# Altium PCB PCI Express_16765X6890_64PIN_Low profile.PCBDOC (part 1 of 5)
Units mm, origin at the board's own origin, x right, y up, seen from the top; angles counter-clockwise.
Board outline 167.65 x 68.9 mm, 6 copper layers (TopLayer, AGround_Layer, InternalPlane1, Power_Layer, Ground_Layer, BottomLayer), stack 1.141 mm thick; 897 components, 648 nets, 2942 pads, 321 vias.
Unrouted connection lines stored in the file: 1996.
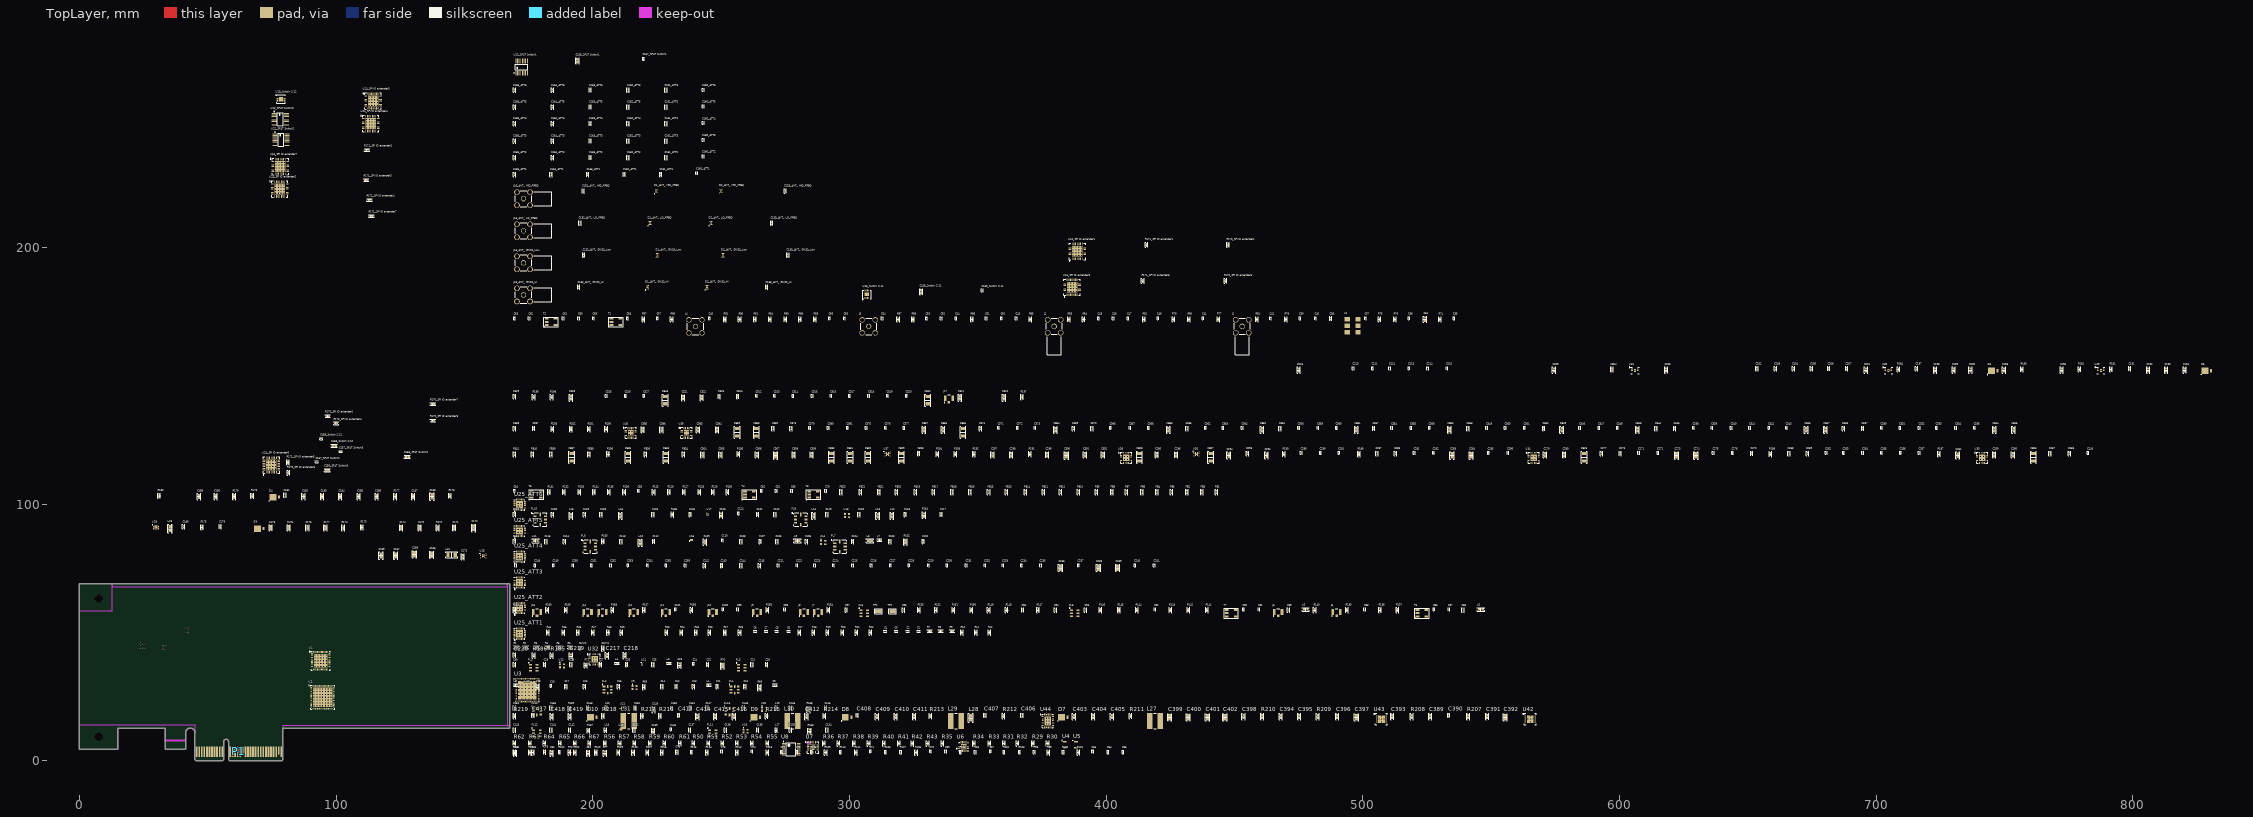
[diagram p0: TopLayer view]
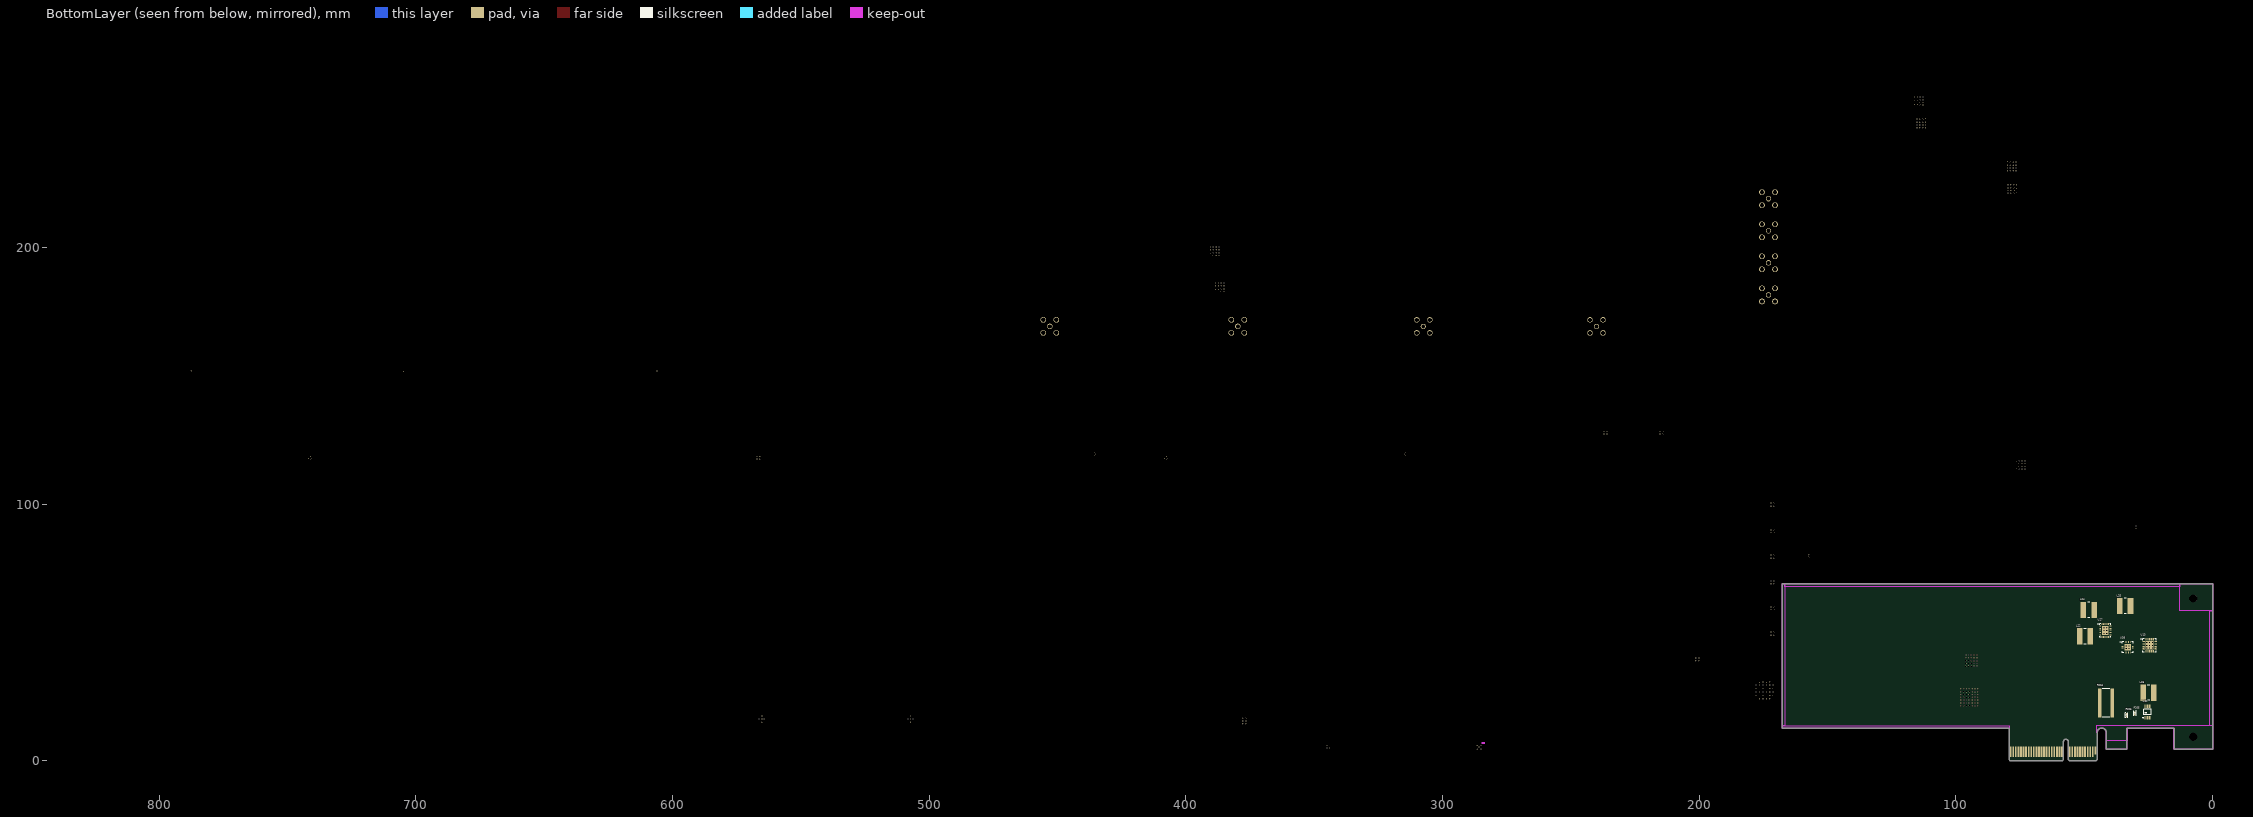
[diagram p1: BottomLayer view, seen from below]
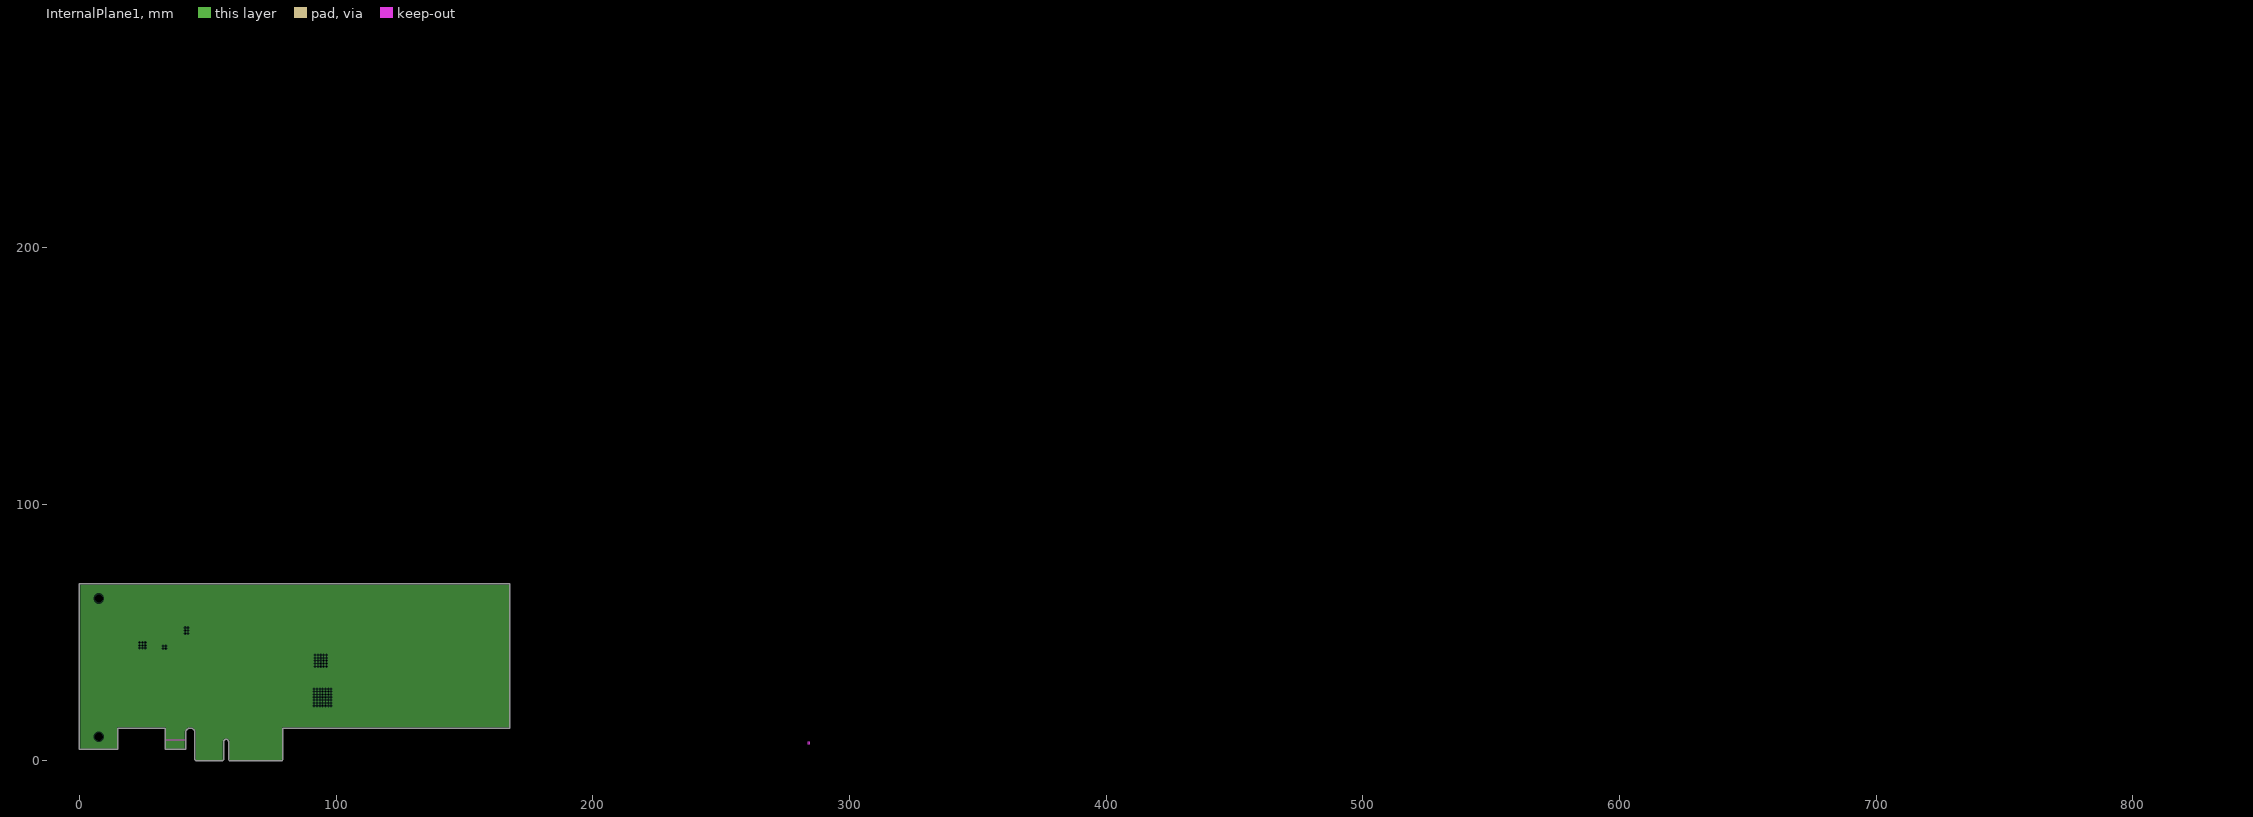
[diagram p2: InternalPlane1, clearances drawn from the general rule]
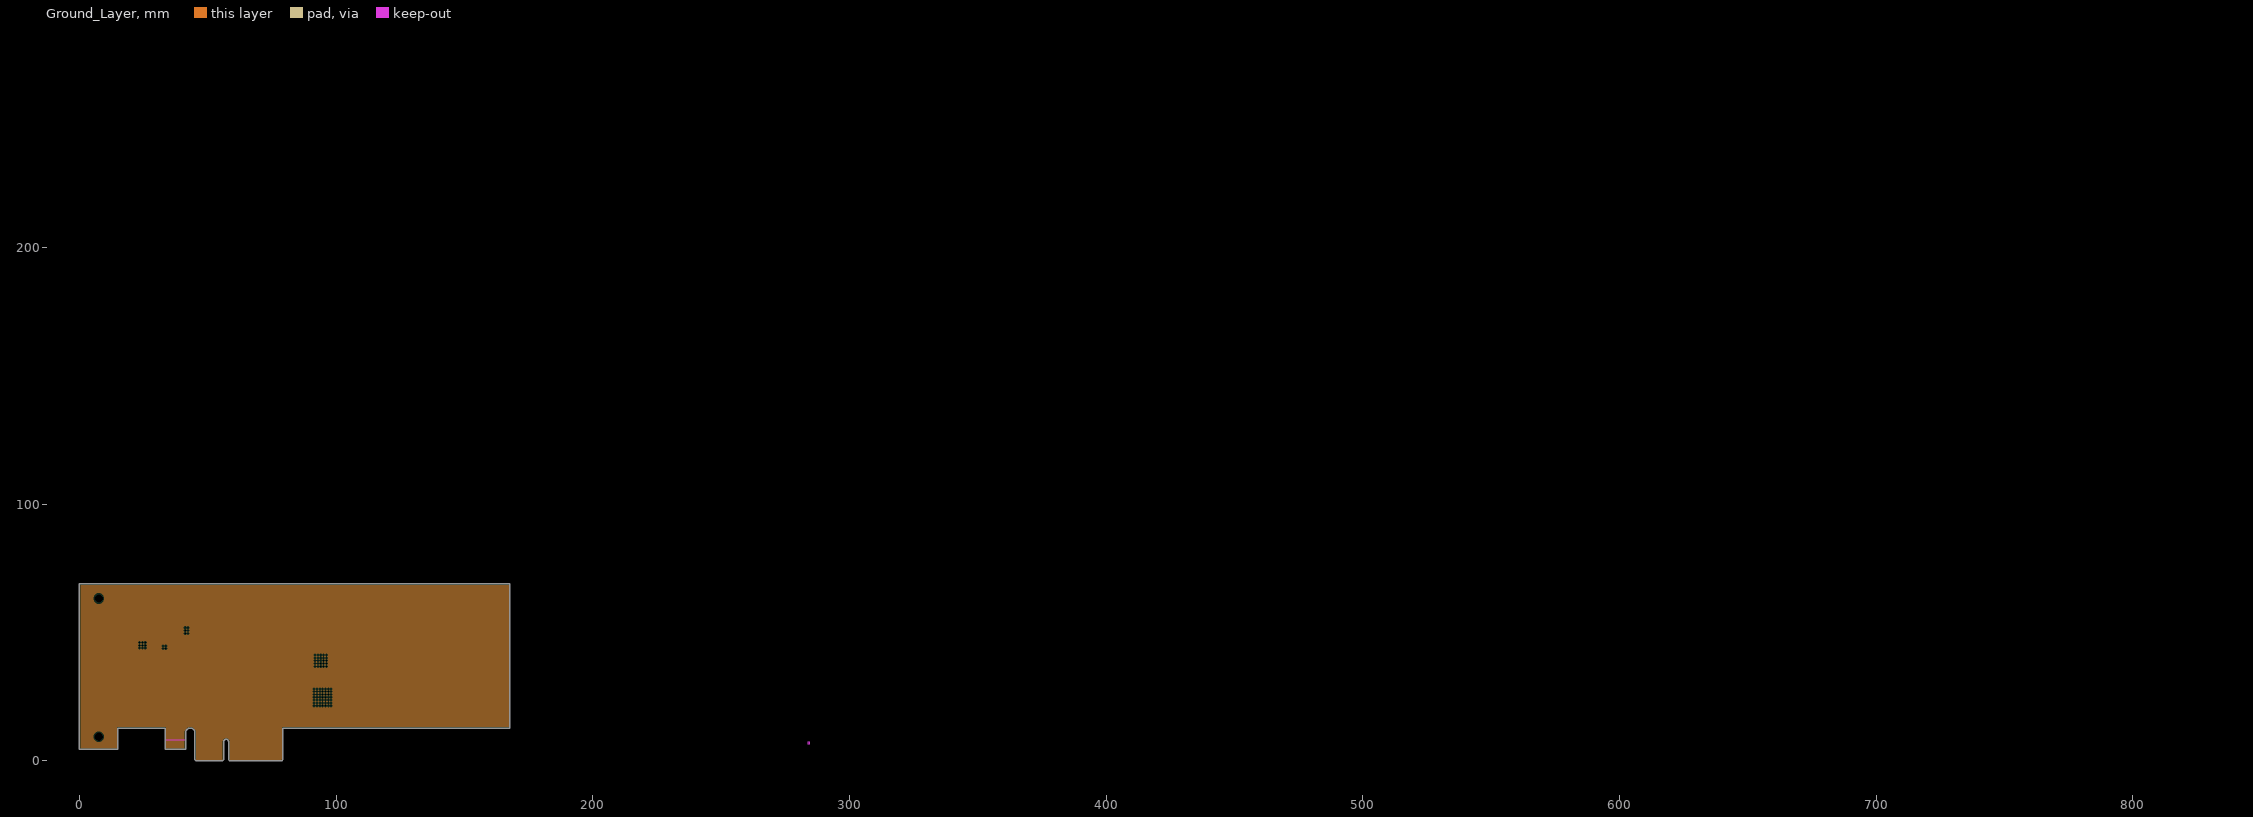
[diagram p3: Ground_Layer, clearances drawn from the general rule]

## Layer stack, top to bottom
TopSolder: solder mask 0.0102, Solder Resist, Dk 3.5
TopLayer: signal copper 0.0178
Dielectric1: core 0.2, ROG, Dk 4.8
AGround_Layer: signal copper 0.036
Dielectric 4: prepreg 0.127, FR-4, Dk 4.2
InternalPlane1: plane copper 0.0356
Dielectric 5: core 0.254, FR-4, Dk 4.2
Power_Layer: signal copper 0.036
Dielectric2: prepreg 0.127, FR-4, Dk 4.2
Ground_Layer: plane copper 0.0356
Dielectric3: core 0.254, FR-4, Dk 4.2
BottomLayer: signal copper 0.0178
BottomSolder: solder mask 0.0102, Solder Resist, Dk 3.5

## Board outline
0,4.5 15,4.5 15,12.75 33.35,12.75 33.35,4.5 41.35,4.5 41.35,10.925 cw(c43.175,10.925) 45,10.925 45,0.5 45.5,0 55.7,0 56.2,0.5 56.2,7.45 cw(c57.15,7.45) 58.1,7.45 58.1,0.5 58.6,0 78.8,0 79.3,0.5 79.3,12.75 167.65,12.75 167.65,68.9 0,68.9

## Design rules (kind name [scope] priority, off if disabled: settings)
Clearance [All] p1: gap=0.1 ignorepadtopadclearanceinfootprint=FALSE
DiffPairsRouting [All] p1: maxlimit=0.254 minlimit=0.254 mostfreqgap=0.254 toplayer_minwidth=0.381 toplayer_maxwidth=0.381 toplayer_prefwidth=0.381 midlayer1_minwidth=0.381 midlayer1_maxwidth=0.381 midlayer1_prefwidth=0.381 midlayer2_minwidth=0.381 midlayer2_maxwidth=0.381 midlayer2_prefwidth=0.381 bottomlayer_minwidth=0.381 bottomlayer_maxwidth=0.381 bottomlayer_prefwidth=0.381 maxuncoupledlength=12.7
FabricationTestPointUsage TestPointUsage [All] p1: valid=0 allowmultiple=FALSE
FabricationTestpoint Testpoint [All] p1: side=3 testpointundercomponent=TRUE minsize=1.016 maxsize=2.54 preferedsize=1.524 minholesize=0.508 maxholesize=1.016 preferedholesize=0.813 testpointgrid=0.025 allowsidetop=TRUE allowsidebottom=TRUE usegrid=TRUE gridtolerance=0
Height "PCI Express, Page 84, \"Component Height Constraints\" for solder side" [OnBottomLayer] p1: minheight=0 maxheight=2.67 prefheight=2.67
Height "PCI Express, Page 84, \"Component Height Constraints\" for component side" [OnTopLayer] p2: minheight=0 maxheight=14.47 prefheight=14.47
Length "Schematic Length Constraint_23" [InNet('O2_N')] p1: maxlimit=2540 minlimit=0
Length "Schematic Length Constraint_22" [InNet('O1_P')] p2: maxlimit=2540 minlimit=0
Length "Schematic Length Constraint_21" [InNet('O1_N')] p3: maxlimit=2540 minlimit=0
Length "Schematic Length Constraint_20" [InNet('CLKout9_P')] p4: maxlimit=2540 minlimit=0
Length "Schematic Length Constraint_19" [InNet('CLKout9_N')] p5: maxlimit=2540 minlimit=0
Length "Schematic Length Constraint_18" [InNet('CLKout10_P')] p6: maxlimit=2540 minlimit=0
Length "Schematic Length Constraint_17" [InNet('O8_N')] p7: maxlimit=2540 minlimit=0
Length "Schematic Length Constraint_16" [InNet('O8_P')] p8: maxlimit=2540 minlimit=0
Length "Schematic Length Constraint_15" [InNet('CLKout8_P')] p9: maxlimit=2540 minlimit=0
Length "Schematic Length Constraint_14" [InNet('CLKout10_N')] p10: maxlimit=2540 minlimit=0
Length "Schematic Length Constraint_13" [InNet('O6_P')] p11: maxlimit=2540 minlimit=0
Length "Schematic Length Constraint_12" [InNet('O6_N')] p12: maxlimit=2540 minlimit=0
Length "Schematic Length Constraint_11" [InNet('O10_P')] p13: maxlimit=2540 minlimit=0
Length "Schematic Length Constraint_10" [InNet('O2_P')] p14: maxlimit=2540 minlimit=0
Length "Schematic Length Constraint_9" [InNet('O10_N')] p15: maxlimit=2540 minlimit=0
Length "Schematic Length Constraint_8" [InNet('CLKout8_N')] p16: maxlimit=2540 minlimit=0
Length "Schematic Length Constraint_7" [InNet('CLKout2_N')] p17: maxlimit=2540 minlimit=0
Length "Schematic Length Constraint_6" [InNet('CLKout6_P')] p18: maxlimit=2540 minlimit=0
Length "Schematic Length Constraint_5" [InNet('O9_N')] p19: maxlimit=2540 minlimit=0
Length "Schematic Length Constraint_4" [InNet('O9_P')] p20: maxlimit=2540 minlimit=0
Length "Schematic Length Constraint_3" [InNet('CLKout1_P')] p21: maxlimit=2540 minlimit=0
Length "Schematic Length Constraint_2" [InNet('CLKout1_N')] p22: maxlimit=2540 minlimit=0
Length "Schematic Length Constraint_1" [InNet('CLKout6_N')] p23: maxlimit=2540 minlimit=0
Length "Schematic Length Constraint" [InNet('CLKout2_P')] p24: maxlimit=2540 minlimit=0
MaxMinImpedance "Schematic Impedance Constraint_91" [InNet('CMLout1_N')] p1: minimum=50,00 maximum=50,00
MaxMinImpedance "Schematic Impedance Constraint_90" [InNet('CMLout1_P')] p2: minimum=50,00 maximum=50,00
MaxMinImpedance "Schematic Impedance Constraint_89" [InNet('CMLout2_N')] p3: minimum=50,00 maximum=50,00
MaxMinImpedance "Schematic Impedance Constraint_88" [InNet('LnaInHi')] p4: minimum=50,00 maximum=50,00
MaxMinImpedance "Schematic Impedance Constraint_87" [InNet('LnaInLo')] p5: minimum=50,00 maximum=50,00
MaxMinImpedance "Schematic Impedance Constraint_86" [InNet('LnaOutHi')] p6: minimum=50,00 maximum=50,00
MaxMinImpedance "Schematic Impedance Constraint_85" [InNet('LnaOutLo')] p7: minimum=50,00 maximum=50,00
MaxMinImpedance "Schematic Impedance Constraint_84" [InNet('MaxCLKOut')] p8: minimum=50,00 maximum=50,00
MaxMinImpedance "Schematic Impedance Constraint_83" [InNet('MaxI0')] p9: minimum=50,00 maximum=50,00
MaxMinImpedance "Schematic Impedance Constraint_82" [InNet('MaxI1')] p10: minimum=50,00 maximum=50,00
MaxMinImpedance "Schematic Impedance Constraint_81" [InNet('MaxQ0')] p11: minimum=50,00 maximum=50,00
MaxMinImpedance "Schematic Impedance Constraint_80" [InNet('MaxQ1')] p12: minimum=50,00 maximum=50,00
MaxMinImpedance "Schematic Impedance Constraint_79" [InNet('MixInHi')] p13: minimum=50,00 maximum=50,00
MaxMinImpedance "Schematic Impedance Constraint_78" [InNet('MixInLo')] p14: minimum=50,00 maximum=50,00
MaxMinImpedance "Schematic Impedance Constraint_77" [InNet('NetC86_2')] p15: minimum=50,00 maximum=50,00
MaxMinImpedance "Schematic Impedance Constraint_76" [InNet('NetC87_1')] p16: minimum=50,00 maximum=50,00
MaxMinImpedance "Schematic Impedance Constraint_75" [InNet('NetC88_2')] p17: minimum=50,00 maximum=50,00
MaxMinImpedance "Schematic Impedance Constraint_74" [InNet('NetC90_2')] p18: minimum=50,00 maximum=50,00
MaxMinImpedance "Schematic Impedance Constraint_38" [InNet('NetC91_1')] p19: minimum=50,00 maximum=50,00
MaxMinImpedance "Schematic Impedance Constraint_36" [InNet('NetC92_2')] p20: minimum=50,00 maximum=50,00
MaxMinImpedance "Schematic Impedance Constraint_31" [InNet('NetC93_2')] p21: minimum=50,00 maximum=50,00
MaxMinImpedance "Schematic Impedance Constraint_30" [InNet('NetC94_1')] p22: minimum=50,00 maximum=50,00
MaxMinImpedance "Schematic Impedance Constraint_26" [InNet('NetC96_2')] p23: minimum=50,00 maximum=50,00
MaxMinImpedance "Schematic Impedance Constraint_24" [InNet('NetC97_1')] p24: minimum=50,00 maximum=50,00
MaxMinImpedance "Schematic Impedance Constraint_23" [InNet('NetC98_2')] p25: minimum=50,00 maximum=50,00
MaxMinImpedance "Schematic Impedance Constraint_22" [InNet('NetC100_2')] p26: minimum=50,00 maximum=50,00
MaxMinImpedance "Schematic Impedance Constraint_21" [InNet('NetFL6_5')] p27: minimum=50,00 maximum=50,00
MaxMinImpedance "Schematic Impedance Constraint_20" [InNet('NetJ5_2')] p28: minimum=50,00 maximum=50,00
MaxMinImpedance "Schematic Impedance Constraint_19" [InNet('NetJ6_2')] p29: minimum=50,00 maximum=50,00
MaxMinImpedance "Schematic Impedance Constraint_18" [InNet('NetJ8_2')] p30: minimum=50,00 maximum=50,00
MaxMinImpedance "Schematic Impedance Constraint_17" [InNet('NetJ10_2')] p31: minimum=50,00 maximum=50,00
MaxMinImpedance "Schematic Impedance Constraint_15" [InNet('NetJ11_2')] p32: minimum=50,00 maximum=50,00
MaxMinImpedance "Schematic Impedance Constraint_11" [InNet('NetJ12_2')] p33: minimum=50,00 maximum=50,00
MaxMinImpedance "Schematic Impedance Constraint_10" [InNet('NetJ13_2')] p34: minimum=50,00 maximum=50,00
MaxMinImpedance "Schematic Impedance Constraint_9" [InNet('NetJ14_2')] p35: minimum=50,00 maximum=50,00
MaxMinImpedance "Schematic Impedance Constraint_7" [InNet('NetJ15_2')] p36: minimum=50,00 maximum=50,00
MaxMinImpedance "Schematic Impedance Constraint_6" [InNet('NetR137_2')] p37: minimum=50,00 maximum=50,00
MaxMinImpedance "Schematic Impedance Constraint_5" [InNet('NetR138_2')] p38: minimum=50,00 maximum=50,00
MaxMinImpedance "Schematic Impedance Constraint_4" [InNet('NetR141_2')] p39: minimum=50,00 maximum=50,00
MaxMinImpedance "Schematic Impedance Constraint_3" [InNet('NetR143_2')] p40: minimum=50,00 maximum=50,00
MaxMinImpedance "Schematic Impedance Constraint_2" [InNet('MAXQout')] p41: minimum=50,00 maximum=50,00
MaxMinImpedance "Schematic Impedance Constraint_1" [InNet('MAXIout')] p42: minimum=50,00 maximum=50,00
MaxMinImpedance "Schematic Impedance Constraint_49" [InNet('O1_N')] p43: minimum=50,00 maximum=50,00
MaxMinImpedance "Schematic Impedance Constraint_48" [InNet('O2_N')] p44: minimum=50,00 maximum=50,00
MaxMinImpedance "Schematic Impedance Constraint_47" [InNet('O1_P')] p45: minimum=50,00 maximum=50,00
MaxMinImpedance "Schematic Impedance Constraint_46" [InNet('CLKout10_N')] p46: minimum=50,00 maximum=50,00
MaxMinImpedance "Schematic Impedance Constraint_45" [InNet('O8_P')] p47: minimum=50,00 maximum=50,00
MaxMinImpedance "Schematic Impedance Constraint_44" [InNet('CLKout10_P')] p48: minimum=50,00 maximum=50,00
MaxMinImpedance "Schematic Impedance Constraint_43" [InNet('CLKout9_N')] p49: minimum=50,00 maximum=50,00
MaxMinImpedance "Schematic Impedance Constraint_42" [InNet('CLKout9_P')] p50: minimum=50,00 maximum=50,00
MaxMinImpedance "Schematic Impedance Constraint_41" [InNet('CLKout8_P')] p51: minimum=50,00 maximum=50,00
MaxMinImpedance "Schematic Impedance Constraint_40" [InNet('O8_N')] p52: minimum=50,00 maximum=50,00
MaxMinImpedance "Schematic Impedance Constraint_39" [InNet('O10_P')] p53: minimum=50,00 maximum=50,00
MaxMinImpedance "Schematic Impedance Constraint_37" [InNet('O6_N')] p54: minimum=50,00 maximum=50,00
MaxMinImpedance "Schematic Impedance Constraint_35" [InNet('CLKout2_P')] p55: minimum=50,00 maximum=50,00
MaxMinImpedance "Schematic Impedance Constraint_34" [InNet('O6_P')] p56: minimum=50,00 maximum=50,00
MaxMinImpedance "Schematic Impedance Constraint_33" [InNet('O10_N')] p57: minimum=50,00 maximum=50,00
MaxMinImpedance "Schematic Impedance Constraint_32" [InNet('O2_P')] p58: minimum=50,00 maximum=50,00
MaxMinImpedance "Schematic Impedance Constraint_29" [InNet('O9_N')] p59: minimum=50,00 maximum=50,00
MaxMinImpedance "Schematic Impedance Constraint_28" [InNet('CLKout8_N')] p60: minimum=50,00 maximum=50,00
MaxMinImpedance "Schematic Impedance Constraint_27" [InNet('O9_P')] p61: minimum=50,00 maximum=50,00
MaxMinImpedance "Schematic Impedance Constraint_14" [InNet('CLKout2_N')] p62: minimum=50,00 maximum=50,00
MaxMinImpedance "Schematic Impedance Constraint_13" [InNet('CLKout1_N')] p63: minimum=50,00 maximum=50,00
MaxMinImpedance "Schematic Impedance Constraint_12" [InNet('CLKout1_P')] p64: minimum=50,00 maximum=50,00
MaxMinImpedance "Schematic Impedance Constraint_8" [InNet('CLKout6_P')] p65: minimum=50,00 maximum=50,00
MaxMinImpedance "Schematic Impedance Constraint" [InNet('CLKout6_N')] p66: minimum=50,00 maximum=50,00
PlaneClearance [All] p1: clearance=0.5
PlaneConnect [All] p1: planeconnectstyle=Relief reliefexpansion=0.508 reliefentries=4 reliefconductorwidth=0.254 reliefairgap=0.254
PolygonConnect [All] p1: connectstyle=Relief reliefconductorwidth=0.254 reliefentries=4 polygonreliefangle="90 Angle" airgapwidth=0.254
RoomDefinition "Zasilanie 2" [InComponentClass('Zasilanie 2')] p1: confinementstyle=ConfineIn formatcopy=TRUE lockcomponents=FALSE outline 168.749,12 567.999,12 567.999,21.5 168.749,21.5
RoomDefinition "Switch 2:12" [InComponentClass('Switch 2:12')] p2: confinementstyle=ConfineIn formatcopy=TRUE lockcomponents=FALSE outline -100,-100 -49.2,-100 -49.2,-74.6 -100,-74.6
RoomDefinition "SPI IO extender7" [InComponentClass('SPI IO extender7')] p3: confinementstyle=ConfineIn formatcopy=TRUE lockcomponents=FALSE outline -100,-100 -49.2,-100 -49.2,-74.6 -100,-74.6
RoomDefinition "SPI IO extender4" [InComponentClass('SPI IO extender4')] p4: confinementstyle=ConfineIn formatcopy=TRUE lockcomponents=FALSE outline -100,-100 -49.2,-100 -49.2,-74.6 -100,-74.6
RoomDefinition "SPI IO extender3" [InComponentClass('SPI IO extender3')] p5: confinementstyle=ConfineIn formatcopy=TRUE lockcomponents=FALSE outline -100,-100 -49.2,-100 -49.2,-74.6 -100,-74.6
RoomDefinition "SPI IO extender2" [InComponentClass('SPI IO extender2')] p6: confinementstyle=ConfineIn formatcopy=TRUE lockcomponents=FALSE outline -100,-100 -49.2,-100 -49.2,-74.6 -100,-74.6
RoomDefinition "SP4T Switch3" [InComponentClass('SP4T Switch3')] p7: confinementstyle=ConfineIn formatcopy=TRUE lockcomponents=FALSE outline -100,-100 -49.2,-100 -49.2,-74.6 -100,-74.6
RoomDefinition "SP4T Switch2" [InComponentClass('SP4T Switch2')] p8: confinementstyle=ConfineIn formatcopy=TRUE lockcomponents=FALSE outline -100,-100 -49.2,-100 -49.2,-74.6 -100,-74.6
RoomDefinition Zegary [InComponentClass('Zegary')] p9: confinementstyle=ConfineIn formatcopy=TRUE lockcomponents=FALSE outline 168.749,157.749 539.999,157.749 539.999,175.999 168.749,175.999
RoomDefinition "Zasilanie RF" [InComponentClass('Zasilanie RF')] p10: confinementstyle=ConfineIn formatcopy=TRUE lockcomponents=FALSE outline 168.749,147 835.75,147 835.75,156.499 168.749,156.499
RoomDefinition "Zasilanie LTC2122" [InComponentClass('Zasilanie LTC2122')] p11: confinementstyle=ConfineIn formatcopy=TRUE lockcomponents=FALSE outline 168.749,134.5 372.749,134.5 372.749,145.75 168.749,145.75
RoomDefinition "Zasilanie LMK04610" [InComponentClass('Zasilanie LMK04610')] p12: confinementstyle=ConfineIn formatcopy=TRUE lockcomponents=FALSE outline 168.749,124.75 758.998,124.75 758.998,133.25 168.749,133.25
RoomDefinition "Zasilanie AD9690" [InComponentClass('Zasilanie AD9690')] p13: confinementstyle=ConfineIn formatcopy=TRUE lockcomponents=FALSE outline 168.749,110 791.75,110 791.75,123.5 168.749,123.5
RoomDefinition "Tory Radiowe" [InComponentClass('Tory Radiowe')] p14: confinementstyle=ConfineIn formatcopy=TRUE lockcomponents=FALSE outline 168.749,101.25 446.749,101.25 446.749,108.75 168.749,108.75
RoomDefinition "Tor 2 Tetra 420±10MHz" [InComponentClass('Tor 2 Tetra 420±10MHz')] p15: confinementstyle=ConfineIn formatcopy=TRUE lockcomponents=FALSE outline 168.749,90.75 340.999,90.75 340.999,100 168.749,100
RoomDefinition "Tor 1 ILS 110±4 MHz" [InComponentClass('Tor 1 ILS 110±4 MHz')] p16: confinementstyle=ConfineIn formatcopy=TRUE lockcomponents=FALSE outline 168.749,80.25 332.999,80.25 332.999,89.5 168.749,89.5
RoomDefinition "Switch 2:11" [InComponentClass('Switch 2:11')] p17: confinementstyle=ConfineIn formatcopy=TRUE lockcomponents=FALSE outline 304.749,179.249 373.999,179.249 373.999,186.999 304.749,186.999
RoomDefinition "SPI IO extender6" [InComponentClass('SPI IO extender6')] p18: confinementstyle=ConfineIn formatcopy=TRUE lockcomponents=FALSE outline 382.749,180.249 477.249,180.249 477.249,191.249 382.749,191.249
RoomDefinition "SPI IO extender1" [InComponentClass('SPI IO extender1')] p19: confinementstyle=ConfineIn formatcopy=TRUE lockcomponents=FALSE outline 384.749,194.249 477.749,194.249 477.749,205.249 384.749,205.249
RoomDefinition "SP4T Switch1" [InComponentClass('SP4T Switch1')] p20: confinementstyle=ConfineIn formatcopy=TRUE lockcomponents=FALSE outline 168.749,266.249 244.249,266.249 244.249,277.249 168.749,277.249
RoomDefinition "Pomiar pr¹du i napiêcia" [InComponentClass('Pomiar pr¹du i napiêcia')] p21: confinementstyle=ConfineIn formatcopy=TRUE lockcomponents=FALSE outline 169.249,-19 196.749,-19 196.749,-4 169.249,-4
RoomDefinition MAX2771 [InComponentClass('MAX2771')] p22: confinementstyle=ConfineIn formatcopy=TRUE lockcomponents=FALSE outline 168.749,55 547.749,55 547.749,62.5 168.749,62.5
RoomDefinition komunikacja [InComponentClass('komunikacja')] p23: confinementstyle=ConfineIn formatcopy=TRUE lockcomponents=FALSE outline 168.749,48.75 358.499,48.75 358.499,53.75 168.749,53.75
RoomDefinition "KartaRF 0-450 AD6676" [InComponentClass('KartaRF 0-450 AD6676')] p24: confinementstyle=ConfineIn formatcopy=TRUE lockcomponents=FALSE outline 168.999,42.5 210.749,42.5 210.749,47.5 168.999,47.5
RoomDefinition "GNSS 1575.42±21 MHz" [InComponentClass('GNSS 1575.42±21 MHz')] p25: confinementstyle=ConfineIn formatcopy=TRUE lockcomponents=FALSE outline 168.749,34 271.749,34 271.749,41.25 168.749,41.25
RoomDefinition "GNSS 1251±49 MHz" [InComponentClass('GNSS 1251±49 MHz')] p26: confinementstyle=ConfineIn formatcopy=TRUE lockcomponents=FALSE outline 168.749,25.5 273.249,25.5 273.249,32.75 168.749,32.75
RoomDefinition "GNSS 1207.13±6 MHz" [InComponentClass('GNSS 1207.13±6 MHz')] p27: confinementstyle=ConfineIn formatcopy=TRUE lockcomponents=FALSE outline 168.749,17 296.249,17 296.249,24.25 168.749,24.25
RoomDefinition "GNSS 1176,45±21 MHz" [InComponentClass('GNSS 1176,45±21 MHz')] p28: confinementstyle=ConfineIn formatcopy=TRUE lockcomponents=FALSE outline 168.749,8.5 296.749,8.5 296.749,15.75 168.749,15.75
RoomDefinition ATT6 [InComponentClass('ATT6')] p29: confinementstyle=ConfineIn formatcopy=TRUE lockcomponents=FALSE outline 168.749,259.999 256.249,259.999 256.249,265.249 168.749,265.249
RoomDefinition ATT5 [InComponentClass('ATT5')] p30: confinementstyle=ConfineIn formatcopy=TRUE lockcomponents=FALSE outline 168.749,253.499 256.249,253.499 256.249,258.749 168.749,258.749
RoomDefinition ATT4 [InComponentClass('ATT4')] p31: confinementstyle=ConfineIn formatcopy=TRUE lockcomponents=FALSE outline 168.749,246.999 256.249,246.999 256.249,252.249 168.749,252.249
RoomDefinition ATT3 [InComponentClass('ATT3')] p32: confinementstyle=ConfineIn formatcopy=TRUE lockcomponents=FALSE outline 168.749,240.249 256.249,240.249 256.249,245.749 168.749,245.749
RoomDefinition ATT2 [InComponentClass('ATT2')] p33: confinementstyle=ConfineIn formatcopy=TRUE lockcomponents=FALSE outline 168.749,233.749 256.249,233.749 256.249,239.249 168.749,239.249
RoomDefinition ATT1 [InComponentClass('ATT1')] p34: confinementstyle=ConfineIn formatcopy=TRUE lockcomponents=FALSE outline 168.749,227.249 253.249,227.249 253.249,232.749 168.749,232.749
RoomDefinition "ANT_ MID_FREQ" [InComponentClass('ANT_ MID_FREQ')] p35: confinementstyle=ConfineIn formatcopy=TRUE lockcomponents=FALSE outline 168.749,214.749 301.999,214.749 301.999,225.999 168.749,225.999
RoomDefinition "ANT_ LO_FREQ" [InComponentClass('ANT_ LO_FREQ')] p36: confinementstyle=ConfineIn formatcopy=TRUE lockcomponents=FALSE outline 168.749,202.249 295.499,202.249 295.499,213.499 168.749,213.499
RoomDefinition "ANT_ GNSS_Low" [InComponentClass('ANT_ GNSS_Low')] p37: confinementstyle=ConfineIn formatcopy=TRUE lockcomponents=FALSE outline 168.749,189.749 303.249,189.749 303.249,200.999 168.749,200.999
RoomDefinition "ANT_ GNSS_Hi" [InComponentClass('ANT_ GNSS_Hi')] p38: confinementstyle=ConfineIn formatcopy=TRUE lockcomponents=FALSE outline 168.749,177.249 292.749,177.249 292.749,188.499 168.749,188.499
RoomDefinition ADCs [InComponentClass('ADCs')] p39: confinementstyle=ConfineIn formatcopy=TRUE lockcomponents=FALSE outline 168.749,1.5 410.999,1.5 410.999,7.25 168.749,7.25
RoomDefinition U_CON_PCI_Express_X4_64PIN [InComponentClass('U_CON_PCI_Express_X4_64PIN')] p40: confinementstyle=ConfineIn formatcopy=TRUE lockcomponents=FALSE outline 39.75,-31.25 90.55,-31.25 90.55,-5.85 39.75,-5.85
RoomDefinition "SPI IO extender5" [InComponentClass('SPI IO extender5')] p41: confinementstyle=ConfineOut formatcopy=TRUE lockcomponents=FALSE outline 142.05,13.75 142.05,14.1 150.2,14.1 150.2,16.1 155.45,16.1 155.45,13.75
RoutingCorners "Schematic Routing Corners_11" [InNet('CLKout9_P')] p1: cornerstyle=Round minsetback=2.54 maxsetback=2.54
RoutingCorners "Schematic Routing Corners_10" [InNet('CLKout9_N')] p2: cornerstyle=Round minsetback=2.54 maxsetback=2.54
RoutingCorners "Schematic Routing Corners_9" [InNet('CLKout8_P')] p3: cornerstyle=Round minsetback=2.54 maxsetback=2.54
RoutingCorners "Schematic Routing Corners_8" [InNet('CLKout10_N')] p4: cornerstyle=Round minsetback=2.54 maxsetback=2.54
RoutingCorners "Schematic Routing Corners_7" [InNet('CLKout8_N')] p5: cornerstyle=Round minsetback=2.54 maxsetback=2.54
RoutingCorners "Schematic Routing Corners_6" [InNet('CLKout10_P')] p6: cornerstyle=Round minsetback=2.54 maxsetback=2.54
RoutingCorners "Schematic Routing Corners_5" [InNet('CLKout2_P')] p7: cornerstyle=Round minsetback=2.54 maxsetback=2.54
RoutingCorners "Schematic Routing Corners_4" [InNet('CLKout6_P')] p8: cornerstyle=Round minsetback=2.54 maxsetback=2.54
RoutingCorners "Schematic Routing Corners_3" [InNet('CLKout1_P')] p9: cornerstyle=Round minsetback=2.54 maxsetback=2.54
RoutingCorners "Schematic Routing Corners_2" [InNet('CLKout2_N')] p10: cornerstyle=Round minsetback=2.54 maxsetback=2.54
RoutingCorners "Schematic Routing Corners_1" [InNet('CLKout1_N')] p11: cornerstyle=Round minsetback=2.54 maxsetback=2.54
RoutingCorners "Schematic Routing Corners" [InNet('CLKout6_N')] p12: cornerstyle=Round minsetback=2.54 maxsetback=2.54
RoutingCorners [All] p13: cornerstyle=45-Degree minsetback=2.54 maxsetback=2.54
RoutingVias [All] p1: holewidth=0.711 width=1.27 viastyle="Through Hole" minholewidth=0.711 minwidth=1.27 maxholewidth=0.711 maxwidth=1.27
SilkToSolderMaskClearance SilkscreenOverComponentPads [IsPad] p1: minsilkscreentomaskgap=0.254 clearancetoexposedcopper=TRUE
SolderMaskExpansion [All] p1: expansion=0
Width [All] p1: maxlimit=0.254 minlimit=0.254 preferedwidth=0.254
22 further rules are at their usual default settings.

## Classes and differential pairs
component class "Zasilanie 2": C13 C17 C31 C33 C38 C108 C117 C139 C141 C142 C143 C147 C155 C169 C171 C372 C373 C375 C378 C380 C383 C385 C386 C388 C405 C416 C417 C418 C419 R207 R208 R209 R210 R211 R212 R213 R214 R215 R216 R217 R218 R219 U42 U43 U44
channel class "Switch 2to1": "Switch 2:11" "Switch 2:12"
channel class SPI_expander: "SPI IO extender1" "SPI IO extender2" "SPI IO extender3" "SPI IO extender4" "SPI IO extender5" "SPI IO extender6" "SPI IO extender7"
channel class "SP4T Switch": "SP4T Switch1" "SP4T Switch2" "SP4T Switch3"
channel class ATT: ATT1 ATT2 ATT3 ATT4 ATT5 ATT6
component class Zegary: C38 C41 C42 C44 C45 C46 C49 C51 C54 C55 C59 C62 C67 C70 C72 C75 C83 J1 J2 J3 J4 R72 R73 R78 R80 R85 R89 R91 R93 R94 R114 R127 R129 R132 R134 R157 R158 R160 R161 R192 R204 T1 T2 X1
component class "Zasilanie RF": C166 C167 C168 C169 C170 C171 C173 C174 C175 C176 C178 C179 C180 C181 C182 C183 C188 C189 C190 C191 C192 C194 C200 C201 C204 D3 D4 D5 D6 FB24 L21 L22 L23 L24 L25 L26 R73 R106 R163 R165 R167 R169 R183 R185 R186 R202 R203 R204 R205 R206 U18 U26 U30 U35 U40
component class "Zasilanie LTC2122": C302 C304 C307 C309 C310 C312 C314 C315 C317 C320 C322 C323 C325 C327 C328 FB42 FB43 J17 R197 R198 R199 U2 U41
component class "Zasilanie LMK04610": C323 C325 C328 C330 C331 C333 C335 C336 C338 C341 C343 C344 C346 C348 C349 C351 C352 C354 C356 C357 C359 C362 C364 C365 C367 C369 C370 C372 C373 C375 C377 C378 C380 C383 C385 C386 C388 FB44 FB45 FB46 FB47 FB48 FB49 FB50 FB51 FB52 FB53 FB54 FB55 FB56 FB57 FB58 FB59 R200 R201 R202 R203 U3 U39 U40
component class "Zasilanie AD9690": C230 C231 C233 C236 C238 C239 C241 C243 C244 C246 C247 C249 C251 C252 C254 C257 C259 C260 C262 C264 C265 C267 C268 C270 C272 C273 C275 C278 C280 C281 C283 C285 C286 C288 C289 C291 C293 C294 C296 C299 C301 C302 C304 C306 C307 C309 FB25 FB26 FB27 FB28 FB29 FB30 FB31 FB32 FB33 FB34 FB35 FB36 FB37 FB38 FB39 FB40 FB41 R187 R188 R189 R190 R191 R192 R193 R194 R195 R196 U1 U35 U39 U40
component class "Tory Radiowe": C80 C83 C88 C91 C93 C96 FB1 FB2 FB3 FB4 FB5 FB6 FB7 FB8 FB9 FB10 FB11 FB12 FB13 FB14 FB15 FB16 FB17 FB18 FB19 FB20 FB21 FB22 FB23 R127 R129 R130 R131 R132 R134 R135 R136 R192 R194 R198 R204 T3 T4 T5
component class "Tor 2 Tetra 420±10MHz": C117 C120 C121 C122 C123 C125 C130 C136 C139 C143 C144 C146 FL9 L14 R165 R194 U16 U17
component class "Switch 2:12": "C158_Switch 2:12" "C159_Switch 2:12" "U23_Switch 2:12"
component class "Switch 2:11": "C158_Switch 2:11" "C159_Switch 2:11" "U23_Switch 2:11"
component class "SPI IO extender7": "R170_SPI IO extender7" "R171_SPI IO extender7" "U24_SPI IO extender7"
component class "SPI IO extender6": "R170_SPI IO extender6" "R171_SPI IO extender6" "U24_SPI IO extender6"
component class "SPI IO extender5": "R170_SPI IO extender5" "R171_SPI IO extender5" "U24_SPI IO extender5"
component class "SPI IO extender4": "R170_SPI IO extender4" "R171_SPI IO extender4" "U24_SPI IO extender4"
component class "SPI IO extender3": "R170_SPI IO extender3" "R171_SPI IO extender3" "U24_SPI IO extender3"
component class "SPI IO extender2": "R170_SPI IO extender2" "R171_SPI IO extender2" "U24_SPI IO extender2"
component class "SPI IO extender1": "R170_SPI IO extender1" "R171_SPI IO extender1" "U24_SPI IO extender1"
component class "SP4T Switch3": "C156_SP4T Switch3" "C157_SP4T Switch3" "U22_SP4T Switch3"
component class "SP4T Switch2": "C156_SP4T Switch2" "C157_SP4T Switch2" "U22_SP4T Switch2"
component class "SP4T Switch1": "C156_SP4T Switch1" "C157_SP4T Switch1" "U22_SP4T Switch1"
component class "Pomiar pr¹du i napiêcia": R204 R205 R206 U41
component class MAX2771: C88 C91 C93 C96 C101 C104 C110 C114 C115 FL5 FL6 J5 J6 J7 J8 J9 J10 J11 J12 J13 J14 J15 L5 L6 R73 R137 R139 R140 R142 R157 R158 R160 R161 R163 R169 R189 T6 T7 TP1 TP2
component class komunikacja: C1 C2 C3 C4 C5 C6 C7 C8 R7 R8 R9 R10 R11 R12 R17 R18 R20 R22 R23 R28 R44 R46 R49 R70 R78 R85 R89 R91 R93 R94 R114 R127 R129 R132 R134 R135 R136 R137 R139 R140 R142 R157 R158 R160 R161 R163 R169 R192 R204 U9 U10 U11 U12 U18
component class "KartaRF 0-450 AD6676": Conn1 Conn2 R1 R2 R3 R4 R5 R6
component class "GNSS 1575.42±21 MHz": C25 C30 C42 C49 FL3 FL4 L3 L4 R70 U11 U12
component class "GNSS 1251±49 MHz": C9 C10 C11 C13 C15 C17 C18 C25 C30 FL1 FL2 L1 L2 R106 R142 U9 U10
component class "GNSS 1207.13±6 MHz": C145 C146 C147 C149 C150 C154 C155 C166 C169 C170 C171 FL13 FL14 L19 L20 R169 R198 U20 U26
component class "GNSS 1176,45±21 MHz": C135 C136 C138 C139 C140 C141 C142 C143 C144 C150 C155 FL11 FL12 L17 L18 R167 R196 U18 U19
component class ATT6: C160_ATT6 C161_ATT6 C162_ATT6 C163_ATT6 C164_ATT6 C165_ATT6 U20_ATT6 U25_ATT6
component class ATT5: C160_ATT5 C161_ATT5 C162_ATT5 C163_ATT5 C164_ATT5 C165_ATT5 U20_ATT5 U25_ATT5
component class ATT4: C160_ATT4 C161_ATT4 C162_ATT4 C163_ATT4 C164_ATT4 C165_ATT4 U20_ATT4 U25_ATT4
component class ATT3: C160_ATT3 C161_ATT3 C162_ATT3 C163_ATT3 C164_ATT3 C165_ATT3 U20_ATT3 U25_ATT3
component class ATT2: C160_ATT2 C161_ATT2 C162_ATT2 C163_ATT2 C164_ATT2 C165_ATT2 U20_ATT2 U25_ATT2
component class ATT1: C160_ATT1 C161_ATT1 C162_ATT1 C163_ATT1 C164_ATT1 C165_ATT1 U20_ATT1 U25_ATT1
component class "ANT_ GNSS_Low": "C132_ANT_ GNSS_Low" "C133_ANT_ GNSS_Low" "D1_ANT_ GNSS_Low" "D2_ANT_ GNSS_Low" "J16_ANT_ GNSS_Low"
component class "ANT_ GNSS_Hi": "C132_ANT_ GNSS_Hi" "C133_ANT_ GNSS_Hi" "D1_ANT_ GNSS_Hi" "D2_ANT_ GNSS_Hi" "J16_ANT_ GNSS_Hi"
channel class "Tor Antenowy": "ANT_ GNSS_L1_FREQ" "ANT_ GNSS_L5_FREQ" "ANT_ LO_FREQ" "ANT_ MID_FREQ"
component class "Tor 1 ILS 110±4 MHz": C104 C108 C109 C110 C114 C115 C117 C121 C130 FL7 FL8 L7 L8 L9 L10 L11 R163 R192 U14 U15
component class "ANT_ MID_FREQ": "C132_ANT_ MID_FREQ" "C133_ANT_ MID_FREQ" "D1_ANT_ MID_FREQ" "D2_ANT_ MID_FREQ" "J16_ANT_ MID_FREQ"
component class "ANT_ LO_FREQ": "C132_ANT_ LO_FREQ" "C133_ANT_ LO_FREQ" "D1_ANT_ LO_FREQ" "D2_ANT_ LO_FREQ" "J16_ANT_ LO_FREQ"
component class ADCs: C67 C70 C72 C75 C80 C83 C88 C91 C96 R106 R114 R135 R136 R137 R139 R140 R142 R157 R158 R160 R161 R163 R169 R189
net class JTAG[1..5]: JTAG1 JTAG2 JTAG3 JTAG4 JTAG5
component class U_CON_PCI_Express_X4_64PIN: P1
differential pair CMLout4: +CMLout4_P -CMLout4_N
differential pair CMLout3: +CMLout3_P -CMLout3_N
differential pair CMLout2: +CMLout2_P -CMLout2_N
differential pair CMLout1: +CMLout1_P -CMLout1_N
differential pair O10: +O10_P -O10_N
differential pair O9: +O9_P -O9_N
differential pair O8: +O8_P -O8_N
differential pair O8P: +O8P_P -O8P_N
differential pair O6: +O6_P -O6_N
differential pair O5: +O5_P -O5_N
differential pair O3: +O3_P -O3_N
differential pair O2: +O2_P -O2_N
differential pair O1: +O1_P -O1_N
differential pair CLKout10: +CLKout10_P -CLKout10_N
differential pair CLKout9: +CLKout9_P -CLKout9_N
differential pair CLKout8: +CLKout8_P -CLKout8_N
differential pair CLKout6: +CLKout6_P -CLKout6_N
differential pair CLKout5: +CLKout5_P -CLKout5_N
differential pair CLKout3: +CLKout3_P -CLKout3_N
differential pair CLKout2: +CLKout2_P -CLKout2_N
differential pair CLKout1: +CLKout1_P -CLKout1_N
differential pair CLKin1P: +CLKin1P_P -CLKin1P_N
differential pair CLKin0: +CLKin0_P -CLKin0_N
differential pair CLKin0P: +CLKin0P_P -CLKin0P_N
differential pair VCXO_OUT: +VCXO_OUT_P -VCXO_OUT_N
differential pair LMK_OSC_IN: +LMK_OSC_IN_P -LMK_OSC_IN_N
differential pair LMK_CLKin1: +LMK_CLKin1_P -LMK_CLKin1_N
differential pair LMK_CLKin0: +LMK_CLKin0_P -LMK_CLKin0_N
differential pair AIn_9690: +AIn_9690_P -AIn_9690_N
differential pair AIn_2122B: +AIn_2122B_P -AIn_2122B_N
differential pair AIn_2122A: +AIn_2122A_P -AIn_2122A_N
differential pair PET3: +PET3_P -PET3_N
differential pair PET2: +PET2_P -PET2_N
differential pair PET1: +PET1_P -PET1_N
differential pair PER3: +PER3_P -PER3_N
differential pair PER2: +PER2_P -PER2_N
differential pair PER1: +PER1_P -PER1_N
differential pair PER0: +PER0_P -PER0_N

## Components (designator, comment, footprint, x,y, rotation, side; value= is the part's Value field where it differs from the comment)
C1 "0.1µF" "CAP 0201/0603 RF" 326.999,50.5 r0 top
C2 "0.1µF" "CAP 0201/0603 RF" 322.749,50.5 r0 top
C3 "0.1µF" "CAP 0201/0603 RF" 318.249,50.5 r0 top
C4 "0.1µF" "CAP 0201/0603 RF" 313.999,50.5 r0 top
C5 "0.1µF" "CAP 0201/0603 RF" 276.249,50.5 r0 top
C6 "0.1µF" "CAP 0201/0603 RF" 271.749,50.5 r0 top
C7 "0.1µF" "CAP 0201/0603 RF" 267.499,50.5 r0 top
C8 "0.1µF" "CAP 0201/0603 RF" 263.249,50.5 r0 top
C9 "33pF" "CAP 0402/1005 RF" 270.999,29.5 r0 top
C10 "33pF" "CAP 0402/1005 RF" 259.249,29 r90 top
C11 "33pF" "CAP 0402/1005 RF" 248.499,29 r90 top
C12 "DNP" "CAP 0402/1005 RF" 232.499,29 r90 top value=33pF
C13 "33pF" "CAP 0402/1005 RF" 239.249,29 r90 top
C14 "33pF" "CAP 0402/1005 RF" 226.999,29 r90 top
C15 "33pF" "CAP 0402/1005 RF" 209.999,29 r90 top
C16 "33pF" "CAP 0402/1005 RF" 196.749,29 r90 top
C17 "33pF" "CAP 0402/1005 RF" 189.499,29 r90 top
C18 "2.2µF" "CAP 0603/1608 RF" 178.499,28.75 r90 top
C19 "0.1µF" "CAP 0201/0603 RF" 183.749,29.25 r90 top
C20 "33pF" "CAP 0402/1005 RF" 267.749,37.5 r90 top
C21 "33pF" "CAP 0402/1005 RF" 261.999,37.5 r90 top
C22 "33pF" "CAP 0402/1005 RF" 244.749,37.5 r90 top
C23 "2.2µF" "CAP 0603/1608 RF" 233.749,37.25 r90 top
C24 "0.1µF" "CAP 0201/0603 RF" 239.249,37.75 r90 top
C25 "33pF" "CAP 0402/1005 RF" 223.499,37.5 r90 top
C26 "33pF" "CAP 0402/1005 RF" 213.249,37.5 r90 top
C27 "33pF" "CAP 0402/1005 RF" 202.999,37.5 r90 top
C28 "33pF" "CAP 0402/1005 RF" 191.499,37.5 r90 top
C29 "DNP" "CAP 0402/1005 RF" 181.249,37.5 r90 top value=33pF
C30 "33pF" "CAP 0402/1005 RF" 169.499,37.5 r90 top
C31 "10µF 0603" "CAP 0603/1608 RF" 198.249,3 r90 top
C32 "10µF 0603" "CAP 0603/1608 RF" 183.999,3 r90 top
C33 "10µF 0603" "CAP 0603/1608 RF" 169.749,3 r90 top
C34 "4.7 µF" "CAP 0603/1608 RF" 524.249,171.999 r90 top
C35 "DNP" "CAP 0201/0603 RF" 535.499,172.499 r90 top value=0.1µF
C36 "0.1µF" "CAP 0201/0603 RF" 517.999,172.499 r90 top
C37 "0.1µF" "CAP 0201/0603 RF" 500.999,172.499 r90 top
C38 "100pF" "CAP 0402/1005 RF" 487.499,172.249 r90 top
C39 "0.1µF" "CAP 0201/0603 RF" 475.499,172.499 r90 top
C40 "0.1µF" "CAP 0201/0603 RF" 481.499,172.499 r90 top
C41 "0.1µF" "CAP 0201/0603 RF" 437.749,172.499 r90 top
C42 "DNP" "CAP 0201/0603 RF" 463.999,172.499 r90 top value=0.1µF
C43 "0.1µF" "CAP 0201/0603 RF" 364.999,172.499 r90 top
C44 "0.1µF" "CAP 0201/0603 RF" 341.499,172.499 r90 top
C45 "0.1µF" "CAP 0201/0603 RF" 245.499,172.499 r90 top
C46 "0.1µF" "CAP 0201/0603 RF" 420.249,172.499 r90 top
C47 "0.1µF" "CAP 0201/0603 RF" 408.499,172.499 r90 top
C48 "0.1µF" "CAP 0201/0603 RF" 402.749,172.499 r90 top
C49 "0.1µF" "CAP 0201/0603 RF" 396.999,172.499 r90 top
C50 "0.1µF" "CAP 0201/0603 RF" 359.249,172.499 r90 top
C51 "0.1µF" "CAP 0201/0603 RF" 353.249,172.499 r90 top
C52 "0.1µF" "CAP 0201/0603 RF" 335.749,172.499 r90 top
C53 "0.1µF" "CAP 0201/0603 RF" 329.999,172.499 r90 top
C54 "0.1µF" "CAP 0201/0603 RF" 312.749,172.499 r90 top
C55 "0.1µF" "CAP 0201/0603 RF" 297.999,172.499 r90 top
C56 "0.1µF" "CAP 0201/0603 RF" 292.249,172.499 r90 top
C57 "0.1µF" "CAP 0201/0603 RF" 225.249,172.499 r90 top
C58 "0.1µF" "CAP 0201/0603 RF" 213.499,172.499 r90 top
C59 "0.1µF" "CAP 0201/0603 RF" 200.249,172.499 r90 top
C60 "0.1µF" "CAP 0201/0603 RF" 194.499,172.499 r90 top
C61 "0.1µF" "CAP 0201/0603 RF" 188.499,172.499 r90 top
C62 "0.1µF" "CAP 0201/0603 RF" 175.249,172.499 r90 top
C63 "0.1µF" "CAP 0201/0603 RF" 169.499,172.499 r90 top
C64 "4pF" "CAP 0201/0603" 400.749,3.5 r90 top
C65 "1pF" "CAP 0201/0603" 406.499,3.5 r90 top
C66 "0.1µF" "CAP 0201/0603 RF" 394.749,3.75 r90 top
C67 "0.1µF" "CAP 0201/0603 RF" 354.999,3.75 r90 top
C68 "1pF" "CAP 0201/0603" 348.999,3.5 r90 top
C69 "0.1µF" "CAP 0201/0603 RF" 337.499,3.75 r90 top
C70 "0.1µF" "CAP 0201/0603 RF" 331.499,3.75 r90 top
C71 "0.1µF" "CAP 0201/0603 RF" 308.249,3.75 r90 top
C72 "4pF" "CAP 0201/0603" 273.499,3.5 r90 top
C73 "1pF" "CAP 0201/0603" 279.499,3.5 r90 top
C74 "0.1µF" "CAP 0201/0603 RF" 261.999,3.75 r90 top
C75 "0.1µF" "CAP 0201/0603 RF" 250.249,3.75 r90 top
C76 "0.1µF" "CAP 0402/1005 RF" 232.749,3.5 r90 top
C77 "2.2µF" "CAP 0603/1608 RF" 204.749,3 r90 top
C78 "0.1µF" "CAP 0402/1005 RF" 181.249,3.5 r90 top
C79 "0.1µF" "CAP 0201/0603 RF" 290.749,105.25 r90 top
C80 "0.1µF" "CAP 0201/0603 RF" 277.499,105.25 r90 top
C81 "0.1µF" "CAP 0201/0603 RF" 271.499,105.25 r90 top
C82 "0.1µF" "CAP 0201/0603 RF" 265.749,105.25 r90 top
C83 "0.1µF" "CAP 0201/0603 RF" 217.749,105.25 r90 top
C84 "0.1µF" "CAP 0201/0603 RF" 169.499,105.25 r90 top
C85 "1.7pF" "CAP 0402/1005 RF" 538.999,58.75 r90 top
C86 "0.1µF" "CAP 0201/0603 RF" 527.749,59 r90 top
C87 "0.1µF" "CAP 0201/0603 RF" 533.499,59 r90 top
C88 "0.1µF" "CAP 0201/0603 RF" 500.749,59 r90 top
C89 "1.1pF" "CAP 0402/1005 RF" 470.999,58.75 r90 top
C90 "0.1µF" "CAP 0201/0603 RF" 453.499,59 r90 top
C91 "0.1µF" "CAP 0201/0603 RF" 459.499,59 r90 top
C92 "0.1µF" "CAP 0201/0603 RF" 418.999,59 r90 top
C93 "1nF" "CAP 0402/1005 RF" 391.999,58.75 r90 top
C94 "1nF" "CAP 0402/1005 RF" 380.249,58.75 r90 top
C95 "750pF" "CAP 0402/1005 RF" 367.499,58.75 r90 top
C96 "1nF" "CAP 0402/1005 RF" 320.999,58.75 r90 top
C97 "1nF" "CAP 0402/1005 RF" 298.749,58.75 r90 top
C98 "0.1µF" "CAP 0201/0603 RF" 274.749,59 r90 top
C99 "0.1µF" "CAP 0201/0603 RF" 256.499,59 r90 top
C100 "0.1µF" "CAP 0201/0603 RF" 250.749,59 r90 top
C101 "0.1µF" "CAP 0201/0603 RF" 232.249,59 r90 top
C102 "330pF 0402" "CAP 0402/1005 RF" 328.749,85.5 r90 top
C103 "330pF 0402" "CAP 0402/1005 RF" 315.749,85.5 r90 top
C104 "330pF 0402" "CAP 0402/1005 RF" 301.249,85.5 r90 top
C105 "330pF 0402" "CAP 0402/1005 RF" 283.249,85.5 r90 top
C106 "2,5pF" "CAP 0402/1005 RF" 271.749,85.5 r90 top
C107 "2,5pF" "CAP 0402/1005 RF" 265.249,85.5 r90 top
C108 "DNP" "CAP 0402/1005 RF" 257.749,85.5 r90 top value="330pF 0402"
C109 "2.2µF" "CAP 0603/1608 RF" 243.749,85.25 r90 top
C110 "0.1µF" "CAP 0201/0603 RF" 250.499,86 r90 top
C112 "330pF 0402" "CAP 0402/1005 RF" 223.749,85.5 r90 top
C113 "330pF 0402" "CAP 0402/1005 RF" 210.999,85.5 r90 top
C114 "2,5pF" "CAP 0402/1005 RF" 188.999,85.5 r90 top
C115 "330pF 0402" "CAP 0402/1005 RF" 181.749,85.5 r90 top
C116 "2,5pF" "CAP 0402/1005 RF" 169.499,85.5 r90 top
C117 "330pF 0402" "CAP 0402/1005 RF" 335.749,96 r90 top
C118 "330pF 0402" "CAP 0402/1005 RF" 321.749,96 r90 top
C119 "330pF 0402" "CAP 0402/1005 RF" 291.249,96 r90 top
C120 "330pF 0402" "CAP 0402/1005 RF" 303.749,96 r90 top
C121 "0.18pF" "CAP 0402/1005 RF" 264.249,96 r90 top
C122 "0.18pF" "CAP 0402/1005 RF" 270.999,96 r90 top
C123 "2.2µF" "CAP 0603/1608 RF" 249.999,95.75 r90 top
C124 "0.1µF" "CAP 0201/0603 RF" 256.749,96.5 r90 top
C125 "330pF 0402" "CAP 0402/1005 RF" 237.999,96 r90 top
C126 "DNP" "CAP 0402/1005 RF" 223.499,96 r90 top value="330pF 0402"
C128 "330pF 0402" "CAP 0402/1005 RF" 203.249,96 r90 top
C129 "330pF 0402" "CAP 0402/1005 RF" 196.749,96 r90 top
C130 "0.18pF" "CAP 0402/1005 RF" 184.249,96 r90 top
C131 "0.18pF" "CAP 0402/1005 RF" 169.499,96 r90 top
"C132_ANT_ GNSS_Hi" "22pF 0402" "CAP 0402/1005 RF" 194.499,184.499 r90 top (schematic designator C132)
"C132_ANT_ GNSS_Low" "22pF 0402" "CAP 0402/1005 RF" 196.499,196.999 r90 top (schematic designator C132)
"C132_ANT_ LO_FREQ" "22pF 0402" "CAP 0402/1005 RF" 194.999,209.499 r90 top (schematic designator C132)
"C132_ANT_ MID_FREQ" "22pF 0402" "CAP 0402/1005 RF" 196.249,221.999 r90 top (schematic designator C132)
"C133_ANT_ GNSS_Hi" "22pF 0402" "CAP 0402/1005 RF" 267.749,184.499 r90 top (schematic designator C133)
"C133_ANT_ GNSS_Low" "22pF 0402" "CAP 0402/1005 RF" 275.999,196.999 r90 top (schematic designator C133)
"C133_ANT_ LO_FREQ" "22pF 0402" "CAP 0402/1005 RF" 269.749,209.499 r90 top (schematic designator C133)
"C133_ANT_ MID_FREQ" "22pF 0402" "CAP 0402/1005 RF" 274.999,221.999 r90 top (schematic designator C133)
C134 "33pF" "CAP 0402/1005 RF" 291.249,12 r90 top
C135 "33pF" "CAP 0402/1005 RF" 276.999,12 r90 top
C136 "33pF" "CAP 0402/1005 RF" 264.249,12 r90 top
C137 "33pF" "CAP 0402/1005 RF" 237.749,12 r90 top
C138 "33pF" "CAP 0402/1005 RF" 251.749,12 r90 top
C139 "2.2µF" "CAP 0603/1608 RF" 223.499,11.5 r90 top
C140 "0.1µF" "CAP 0201/0603 RF" 230.499,12.25 r90 top
C141 "33pF" "CAP 0402/1005 RF" 215.999,12 r90 top
C142 "DNP" "CAP 0402/1005 RF" 190.999,12 r90 top value=33pF
C143 "33pF" "CAP 0402/1005 RF" 169.499,12 r90 top
C144 "33pF" "CAP 0402/1005 RF" 183.749,12 r90 top
C145 "33pF" "CAP 0402/1005 RF" 290.749,20.5 r90 top
C146 "33pF" "CAP 0402/1005 RF" 276.999,20.5 r90 top
C147 "33pF" "CAP 0402/1005 RF" 244.499,20.5 r90 top
C148 "33pF" "CAP 0402/1005 RF" 258.749,20.5 r90 top
C149 "2.2µF" "CAP 0603/1608 RF" 223.749,20 r90 top
C150 "0.1µF" "CAP 0201/0603 RF" 230.749,20.75 r90 top
C151 "33pF" "CAP 0402/1005 RF" 237.999,20.5 r90 top
C152 "33pF" "CAP 0402/1005 RF" 216.499,20.5 r90 top
C153 "DNP" "CAP 0402/1005 RF" 197.999,20.5 r90 top value=33pF
C154 "33pF" "CAP 0402/1005 RF" 169.499,20.5 r90 top
C155 "33pF" "CAP 0402/1005 RF" 183.749,20.5 r90 top
"C156_SP4T Switch1" "2.2µF" "CAP 0603/1608 RF" 193.999,272.749 r90 top (schematic designator C156)
"C156_SP4T Switch2" "2.2µF" "CAP 0603/1608 RF" 127.75,118.5 r0 top (schematic designator C156)
"C156_SP4T Switch3" "2.2µF" "CAP 0603/1608 RF" 96.5,113.25 r0 top (schematic designator C156)
"C157_SP4T Switch1" "0.1µF" "CAP 0201/0603 RF" 219.749,273.499 r90 top (schematic designator C157)
"C157_SP4T Switch2" "0.1µF" "CAP 0201/0603 RF" 92.5,116.5 r0 top (schematic designator C157)
"C157_SP4T Switch3" "0.1µF" "CAP 0201/0603 RF" 101.75,120.5 r0 top (schematic designator C157)
"C158_Switch 2:11" "2.2µF" "CAP 0603/1608 RF" 327.999,182.749 r90 top (schematic designator C158)
"C158_Switch 2:12" "2.2µF" "CAP 0603/1608 RF" 99.25,122.75 r0 top (schematic designator C158)
"C159_Switch 2:11" "0.1µF" "CAP 0201/0603 RF" 351.749,183.249 r90 top (schematic designator C159)
"C159_Switch 2:12" "0.1µF" "CAP 0201/0603 RF" 94.25,125.5 r0 top (schematic designator C159)
C160_ATT1 "0.1µF" "CAP 0201/0603 RF" 240.499,228.999 r90 top (schematic designator C160)
C160_ATT2 "0.1µF" "CAP 0201/0603 RF" 242.999,235.499 r90 top (schematic designator C160)
C160_ATT3 "0.1µF" "CAP 0201/0603 RF" 242.999,241.999 r90 top (schematic designator C160)
C160_ATT4 "0.1µF" "CAP 0201/0603 RF" 242.999,248.499 r90 top (schematic designator C160)
C160_ATT5 "0.1µF" "CAP 0201/0603 RF" 242.999,254.999 r90 top (schematic designator C160)
C160_ATT6 "0.1µF" "CAP 0201/0603 RF" 242.999,261.499 r90 top (schematic designator C160)
C161_ATT1 "10µF" "CAP 0402/1005 RF" 226.499,228.499 r90 top (schematic designator C161)
C161_ATT2 "10µF" "CAP 0402/1005 RF" 228.499,234.999 r90 top (schematic designator C161)
C161_ATT3 "10µF" "CAP 0402/1005 RF" 228.499,241.499 r90 top (schematic designator C161)
C161_ATT4 "10µF" "CAP 0402/1005 RF" 228.499,248.249 r90 top (schematic designator C161)
C161_ATT5 "10µF" "CAP 0402/1005 RF" 228.499,254.749 r90 top (schematic designator C161)
C161_ATT6 "10µF" "CAP 0402/1005 RF" 228.499,261.249 r90 top (schematic designator C161)
C162_ATT1 "330pF 0402" "CAP 0402/1005 RF" 212.249,228.499 r90 top (schematic designator C162)
C162_ATT2 "330pF 0402" "CAP 0402/1005 RF" 213.749,234.999 r90 top (schematic designator C162)
C162_ATT3 "330pF 0402" "CAP 0402/1005 RF" 213.749,241.499 r90 top (schematic designator C162)
C162_ATT4 "330pF 0402" "CAP 0402/1005 RF" 213.749,248.249 r90 top (schematic designator C162)
C162_ATT5 "330pF 0402" "CAP 0402/1005 RF" 213.749,254.749 r90 top (schematic designator C162)
C162_ATT6 "330pF 0402" "CAP 0402/1005 RF" 213.749,261.249 r90 top (schematic designator C162)
C163_ATT1 "330pF 0402" "CAP 0402/1005 RF" 197.999,228.499 r90 top (schematic designator C163)
C163_ATT2 "330pF 0402" "CAP 0402/1005 RF" 198.999,234.999 r90 top (schematic designator C163)
C163_ATT3 "330pF 0402" "CAP 0402/1005 RF" 198.999,241.499 r90 top (schematic designator C163)
C163_ATT4 "330pF 0402" "CAP 0402/1005 RF" 198.999,248.249 r90 top (schematic designator C163)
C163_ATT5 "330pF 0402" "CAP 0402/1005 RF" 198.999,254.749 r90 top (schematic designator C163)
C163_ATT6 "330pF 0402" "CAP 0402/1005 RF" 198.999,261.249 r90 top (schematic designator C163)
C164_ATT1 "330pF 0402" "CAP 0402/1005 RF" 183.749,228.499 r90 top (schematic designator C164)
C164_ATT2 "330pF 0402" "CAP 0402/1005 RF" 184.249,234.999 r90 top (schematic designator C164)
C164_ATT3 "330pF 0402" "CAP 0402/1005 RF" 184.249,241.499 r90 top (schematic designator C164)
C164_ATT4 "330pF 0402" "CAP 0402/1005 RF" 184.249,248.249 r90 top (schematic designator C164)
C164_ATT5 "330pF 0402" "CAP 0402/1005 RF" 184.249,254.749 r90 top (schematic designator C164)
C164_ATT6 "330pF 0402" "CAP 0402/1005 RF" 184.249,261.249 r90 top (schematic designator C164)
C165_ATT1 "330pF 0402" "CAP 0402/1005 RF" 169.499,228.499 r90 top (schematic designator C165)
C165_ATT2 "330pF 0402" "CAP 0402/1005 RF" 169.499,234.999 r90 top (schematic designator C165)
C165_ATT3 "330pF 0402" "CAP 0402/1005 RF" 169.499,241.499 r90 top (schematic designator C165)
C165_ATT4 "330pF 0402" "CAP 0402/1005 RF" 169.499,248.249 r90 top (schematic designator C165)
C165_ATT5 "330pF 0402" "CAP 0402/1005 RF" 169.499,254.749 r90 top (schematic designator C165)
C165_ATT6 "330pF 0402" "CAP 0402/1005 RF" 169.499,261.249 r90 top (schematic designator C165)
C166 "4.7µF" "CAP 0805/2012 RF" 137.25,80.25 r90 top
C167 "4.7µF" "CAP 0805/2012 RF" 123.25,80 r90 top
C168 "4.7µF" "CAP 0805/2012 RF" 130.5,80.5 r90 top
C169 "4.7µF" "CAP 0805/2012 RF" 117.5,80 r90 top
C170 "2200pF" "CAP 0603/1608 RF" 132.575,90.749 r90 top
C171 "4.7 µF" "CAP 0603/1608 RF" 146.075,90.749 r90 top
C172 "10µF" "CAP 0805/2012 RF" 153.574,90.749 r90 top
C173 "10µF" "CAP 0603/1608 RF" 149.324,79.499 r90 top
C174 "10µF" "CAP 0603/1608 RF" 125.325,90.749 r90 top
C175 "4.7 µF" "CAP 0603/1608 RF" 81.575,90.749 r90 top
C176 "4.7 µF" "CAP 0603/1608 RF" 88.825,90.749 r90 top
C177 "4.7 µF" "CAP 0603/1608 RF" 95.825,90.749 r90 top
C178 "4.7 µF" "CAP 0603/1608 RF" 74.575,90.749 r90 top
C179 "22pF" "CAP 0402/1005 RF" 54.825,91.249 r90 top
C180 "1µF" "CAP 0402/1005 RF" 40.575,91.249 r90 top
C181 "22pF" "CAP 0402/1005 RF" 80.075,103.499 r90 top
C182 "4.7 µF" "CAP 0603/1608 RF" 87.325,102.999 r90 top
C183 "4.7 µF" "CAP 0603/1608 RF" 94.575,102.999 r90 top
C184 "4.7 µF" "CAP 0603/1608 RF" 101.575,102.999 r90 top
C185 "4.7 µF" "CAP 0603/1608 RF" 108.825,102.999 r90 top
C186 "2200pF" "CAP 0603/1608 RF" 115.825,102.999 r90 top
C187 "4.7 µF" "CAP 0603/1608 RF" 130.075,102.999 r90 top
C188 "10µF" "CAP 0805/2012 RF" 137.325,102.999 r90 top
C189 "50nF" "CAP 0603/1608 RF" 46.575,102.999 r90 top
C190 "4.7 µF" "CAP 0603/1608 RF" 53.075,102.999 r90 top
C191 "22pF" "CAP 0402/1005 RF" 798.748,152.749 r90 top
C192 "4.7 µF" "CAP 0603/1608 RF" 805.998,152.249 r90 top
C193 "4.7 µF" "CAP 0603/1608 RF" 812.998,152.249 r90 top
C194 "4.7 µF" "CAP 0603/1608 RF" 820.248,152.249 r90 top
C195 "0.47µF" "CAP 0603/1608 RF" 772.248,152.249 r90 top
C196 "0.47µF" "CAP 0603/1608 RF" 749.748,152.249 r90 top
C197 "22pF" "CAP 0402/1005 RF" 715.748,152.749 r90 top
C198 "4.7 µF" "CAP 0603/1608 RF" 722.998,152.249 r90 top
C199 "4.7 µF" "CAP 0603/1608 RF" 730.248,152.249 r90 top
C200 "4.7 µF" "CAP 0603/1608 RF" 736.748,152.249 r90 top
C201 "0.47µF" "CAP 0603/1608 RF" 695.998,152.249 r90 top
C202 "100pF" "CAP 0402/1005 RF" 653.498,152.749 r90 top
C203 "100pF" "CAP 0402/1005 RF" 660.748,152.749 r90 top
C204 "100pF" "CAP 0402/1005 RF" 667.748,152.749 r90 top
C205 "100pF" "CAP 0402/1005 RF" 674.748,152.749 r90 top
C206 "100pF" "CAP 0402/1005 RF" 681.498,152.749 r90 top
C207 "100pF" "CAP 0402/1005 RF" 688.498,152.749 r90 top
C208 "0.47µF" "CAP 0603/1608 RF" 618.249,152.249 r90 top
C209 "0.47µF" "CAP 0603/1608 RF" 574.499,152.249 r90 top
C210 "0.1µF" "CAP 0201/0603 RF" 496.249,152.999 r90 top
C211 "0.1µF" "CAP 0201/0603 RF" 503.749,152.999 r90 top
C212 "0.1µF" "CAP 0201/0603 RF" 510.499,152.999 r90 top
C213 "0.1µF" "CAP 0201/0603 RF" 517.999,152.999 r90 top
C214 "0.1µF" "CAP 0201/0603 RF" 525.249,152.999 r90 top
C215 "0.1µF" "CAP 0201/0603 RF" 532.749,152.999 r90 top
C216 "0.47µF" "CAP 0603/1608 RF" 474.999,152.249 r90 top
C217 "4.7µF" "CAP 0603/1608 RF" 205.499,41 r90 top
C218 "4.7µF" "CAP 0603/1608 RF" 212.499,41 r90 top
C219 "4.7µF" "CAP 0603/1608" 191.499,40.75 r90 top
C220 "1nF" "CAP 0402/1005 RF" 169.499,41.25 r90 top
C221 "0.1µF" "CAP 0201/0603 RF" 272.248,76.25 r90 top
C222 "0.1µF" "CAP 0201/0603 RF" 279.498,76.25 r90 top
C223 "0.1µF" "CAP 0201/0603 RF" 286.498,76.25 r90 top
C224 "0.1µF" "CAP 0201/0603 RF" 293.748,76.25 r90 top
C225 "0.1µF" "CAP 0201/0603 RF" 301.248,76.25 r90 top
C226 "0.1µF" "CAP 0201/0603 RF" 308.498,76.25 r90 top
C227 "0.1µF" "CAP 0201/0603 RF" 315.998,76.25 r90 top
C228 "0.1µF" "CAP 0201/0603 RF" 323.248,76.25 r90 top
C229 "0.1µF" "CAP 0201/0603 RF" 330.748,76.25 r90 top
C230 "0.1µF" "CAP 0201/0603 RF" 337.998,76.25 r90 top
C231 "0.1µF" "CAP 0201/0603 RF" 345.498,76.25 r90 top
C232 "0.1µF" "CAP 0201/0603 RF" 352.748,76.25 r90 top
C233 "0.1µF" "CAP 0201/0603 RF" 359.748,76.25 r90 top
C234 "0.1µF" "CAP 0201/0603 RF" 366.998,76.25 r90 top
C235 "0.1µF" "CAP 0201/0603 RF" 374.498,76.25 r90 top
C236 "10µF" "CAP 0805/2012 RF" 382.248,75.25 r90 top
C237 "0.1µF" "CAP 0201/0603 RF" 389.248,76.25 r90 top
C238 "10µF" "CAP 0805/2012 RF" 396.998,75.25 r90 top
C239 "10µF" "CAP 0805/2012 RF" 404.498,75.25 r90 top
C240 "0.1µF" "CAP 0201/0603 RF" 411.248,76.25 r90 top
C241 "0.1µF" "CAP 0201/0603 RF" 418.748,76.25 r90 top
C242 "10µF" "CAP 0402/1005 RF" 243.498,76 r90 top
C243 "10µF" "CAP 0402/1005 RF" 250.248,76 r90 top
C244 "10µF" "CAP 0402/1005 RF" 257.748,76 r90 top
C245 "10µF" "CAP 0402/1005 RF" 264.998,76 r90 top
C246 "0.1µF" "CAP 0201/0603 RF" 782.498,120 r90 top
C247 "0.1µF" "CAP 0201/0603 RF" 169.998,76.25 r90 top
C248 "0.1µF" "CAP 0201/0603 RF" 177.498,76.25 r90 top
C249 "0.1µF" "CAP 0201/0603 RF" 184.748,76.25 r90 top
C250 "0.1µF" "CAP 0201/0603 RF" 192.248,76.25 r90 top
C251 "0.1µF" "CAP 0201/0603 RF" 199.498,76.25 r90 top
C252 "0.1µF" "CAP 0201/0603 RF" 206.998,76.25 r90 top
C253 "0.1µF" "CAP 0201/0603 RF" 213.748,76.25 r90 top
C254 "0.1µF" "CAP 0201/0603 RF" 221.248,76.25 r90 top
C255 "0.1µF" "CAP 0201/0603 RF" 228.498,76.25 r90 top
C256 "0.1µF" "CAP 0201/0603 RF" 235.998,76.25 r90 top
C257 "10µF" "CAP 0402/1005 RF" 767.748,119.75 r90 top
C258 "10µF" "CAP 0402/1005 RF" 775.248,119.75 r90 top
C259 "4.7µF" "CAP 0603/1608 RF" 745.998,119.25 r90 top
C260 "4.7µF" "CAP 0603/1608 RF" 753.248,119.25 r90 top
C261 "4.7µF" "CAP 0603/1608" 731.748,119 r90 top
C262 "0.1µF" "CAP 0201/0603 RF" 680.498,120 r90 top
C263 "0.1µF" "CAP 0201/0603 RF" 687.248,120 r90 top
C264 "0.1µF" "CAP 0201/0603 RF" 694.748,120 r90 top
C265 "0.1µF" "CAP 0201/0603 RF" 701.998,120 r90 top
C266 "0.1µF" "CAP 0201/0603 RF" 709.498,120 r90 top
C267 "0.1µF" "CAP 0201/0603 RF" 716.748,120 r90 top
C268 "10µF" "CAP 0402/1005 RF" 665.998,119.75 r90 top
C269 "10µF" "CAP 0402/1005 RF" 673.248,119.75 r90 top
C270 "1nF" "CAP 0402/1005 RF" 651.498,119.75 r90 top
C271 "0.1µF" "CAP 0201/0603 RF" 607.499,120 r90 top
C272 "0.1µF" "CAP 0201/0603 RF" 614.999,120 r90 top
C273 "10µF" "CAP 0805/2012 RF" 622.249,119 r90 top
C274 "10µF" "CAP 0805/2012 RF" 629.749,119 r90 top
C275 "0.1µF" "CAP 0201/0603 RF" 636.499,120 r90 top
C276 "0.1µF" "CAP 0201/0603 RF" 643.999,120 r90 top
C277 "10µF" "CAP 0402/1005 RF" 592.999,119.75 r90 top
C278 "10µF" "CAP 0402/1005 RF" 600.249,119.75 r90 top
C279 "4.7µF" "CAP 0603/1608 RF" 570.999,119.25 r90 top
C280 "4.7µF" "CAP 0603/1608 RF" 578.499,119.25 r90 top
C281 "0.1µF" "CAP 0201/0603 RF" 519.999,120 r90 top
C282 "0.1µF" "CAP 0201/0603 RF" 527.499,120 r90 top
C283 "10µF" "CAP 0805/2012 RF" 534.749,119 r90 top